# Altium PCB PCB1.PcbDoc (part 2 of 5)
Units mm, origin at the board's own origin, x right, y up, seen from the top; angles counter-clockwise.
Board outline 50 x 70 mm, 6 copper layers (Top Layer, L2, L3, L4, L5, Bottom Layer), stack 1.232 mm thick; 119 components, 75 nets, 612 pads, 243 vias.
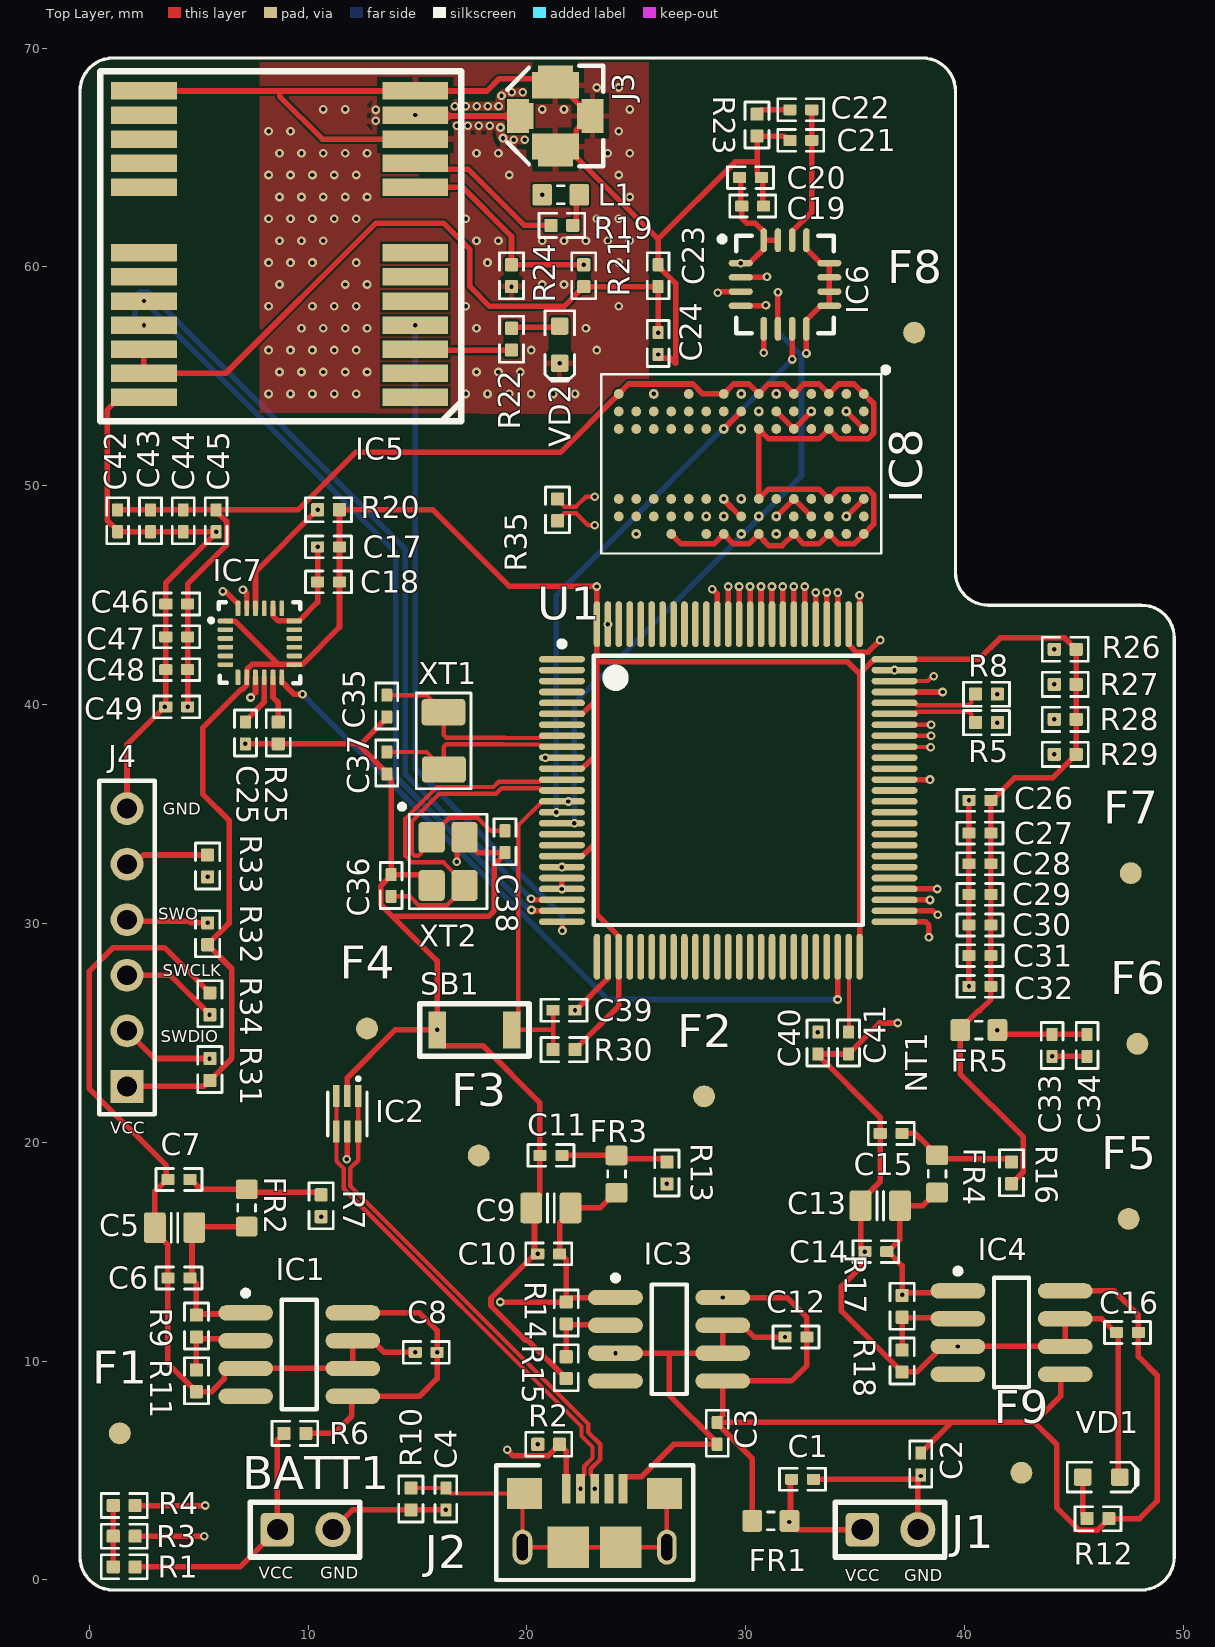
[diagram p0: Top Layer view]

## Part data (continued)
C22: library part Cap, "10V 470nF X5R ±10% 0402 Multilayer Ceramic Capacitors MLCC - SMD/SMT ROHS", Case Code (Imperial)=0402, Case Code (Metric)=1005, Dielectric=X5R, Dielectric Material=Ceramic, Manufacturer=Murata, Manufacturer Lifecycle Status=NRND, Manufacturer Package Identifier=GRM15-0.1, Manufacturer Part Number=GRM155R61A474KE15D, Max Operating Temperature=85°C, Min Operating Temperature=-55°C, Tolerance=10%, Voltage=10V, Case/Package=0402, Category="Ceramic Capacitors", ComponentLink1Description=https://datasheet.octopart.com:443/GRM155R61A474KE15D-Murata-datasheet-62317107.pdf?src-supplier=element14+APAC, ComponentLink1URL=https://datasheet.octopart.com:443/GRM155R61A474KE15D-Murata-datasheet-62317107.pdf?src-supplier=element14+APAC, ComponentLink2Description=https://datasheet.octopart.com:443/GRM155R61A474KE15D-Murata-datasheet-17853093.pdf?src-supplier=element14+APAC, ComponentLink2URL=https://datasheet.octopart.com:443/GRM155R61A474KE15D-Murata-datasheet-17853093.pdf?src-supplier=element14+APAC, ComponentLink3Description=https://datasheet.octopart.com:443/GRM155R61A474KE15D-Murata-datasheet-8817987.pdf?src-supplier=Newark, ComponentLink3URL=https://datasheet.octopart.com:443/GRM155R61A474KE15D-Murata-datasheet-8817987.pdf?src-supplier=Newark, ComponentLink4Description=https://datasheet.octopart.com:443/GRM155R61A474KE15D-Murata-datasheet-8332149.pdf?src-supplier=_legacy+Avnet, ComponentLink4URL=https://datasheet.octopart.com:443/GRM155R61A474KE15D-Murata-datasheet-8332149.pdf?src-supplier=_legacy+Avnet, ComponentLink5Description=https://datasheet.octopart.com:443/GRM155R61A474KE15D-Murata-datasheet-165579666.pdf?src-supplier=TME, ComponentLink5URL=https://datasheet.octopart.com:443/GRM155R61A474KE15D-Murata-datasheet-165579666.pdf?src-supplier=TME, ComponentLink6Description=https://datasheet.octopart.com:443/GRM155R61A474KE15D-Murata-datasheet-141266224.pdf?src-supplier=Ciiva, ComponentLink6URL=https://datasheet.octopart.com:443/GRM155R61A474KE15D-Murata-datasheet-141266224.pdf?src-supplier=Ciiva, ComponentLink7Description=https://datasheet.octopart.com:443/GRM155R61A474KE15D-Murata-datasheet-140690082.pdf?src-supplier=Ciiva, ComponentLink7URL=https://datasheet.octopart.com:443/GRM155R61A474KE15D-Murata-datasheet-140690082.pdf?src-supplier=Ciiva, ComponentLink8Description=https://datasheet.octopart.com:443/GRM155R61A474KE15D-Murata-datasheet-138740728.pdf?src-supplier=Ciiva, ComponentLink8URL=https://datasheet.octopart.com:443/GRM155R61A474KE15D-Murata-datasheet-138740728.pdf?src-supplier=Ciiva, ComponentLink9Description=https://datasheet.octopart.com:443/GRM155R61A474KE15D-Murata-datasheet-22122223.pdf?src-supplier=Future+Electronics, ComponentLink9URL=https://datasheet.octopart.com:443/GRM155R61A474KE15D-Murata-datasheet-22122223.pdf?src-supplier=Future+Electronics, ComponentLink10Description=https://datasheet.octopart.com:443/GRM155R61A474KE15D-Murata-datasheet-14396880.pdf?src-supplier=Future+Electronics, ComponentLink10URL=https://datasheet.octopart.com:443/GRM155R61A474KE15D-Murata-datasheet-14396880.pdf?src-supplier=Future+Electronics, ComponentLink11Description=https://datasheet.octopart.com:443/GRM155R61A474KE15D-Murata-datasheet-44106186.pdf?src-supplier=Future+Electronics, ComponentLink11URL=https://datasheet.octopart.com:443/GRM155R61A474KE15D-Murata-datasheet-44106186.pdf?src-supplier=Future+Electronics, ComponentLink12Description=https://datasheet.octopart.com/GRM155R61A474KE15D-Murata-datasheet-12515295.pdf, ComponentLink12URL=https://datasheet.octopart.com/GRM155R61A474KE15D-Murata-datasheet-12515295.pdf, ComponentLink13Description=https://datasheet.octopart.com/GRM155R61A474KE15D-Murata-datasheet-12510076.pdf, ComponentLink13URL=https://datasheet.octopart.com/GRM155R61A474KE15D-Murata-datasheet-12510076.pdf, ComponentLink14Description=https://datasheet.octopart.com/GRM155R61A474KE15D-Murata-datasheet-11978611.pdf, ComponentLink14URL=https://datasheet.octopart.com/GRM155R61A474KE15D-Murata-datasheet-11978611.pdf, ComponentLink15Description=https://datasheet.octopart.com/GRM155R61A474KE15D-Murata-datasheet-10025737.pdf, ComponentLink15URL=https://datasheet.octopart.com/GRM155R61A474KE15D-Murata-datasheet-10025737.pdf, ComponentLink16Description=https://datasheet.octopart.com/GRM155R61A474KE15D-Murata-datasheet-8819587.pdf, ComponentLink16URL=https://datasheet.octopart.com/GRM155R61A474KE15D-Murata-datasheet-8819587.pdf, ComponentLink17Description=https://datasheet.octopart.com/GRM155R61A474KE15D-Murata-datasheet-14396879.pdf, ComponentLink17URL=https://datasheet.octopart.com/GRM155R61A474KE15D-Murata-datasheet-14396879.pdf, ComponentLink18Description=https://datasheet.octopart.com:443/GRM155R61A474KE15D-Murata-datasheet-11969797.pdf?src-supplier=Arrow+Electronics, ComponentLink18URL=https://datasheet.octopart.com:443/GRM155R61A474KE15D-Murata-datasheet-11969797.pdf?src-supplier=Arrow+Electronics, ComponentLink19Description=https://datasheet.octopart.com:443/GRM155R61A474KE15D-Murata-datasheet-118811.pdf?src-supplier=DigiKey, ComponentLink19URL=https://datasheet.octopart.com:443/GRM155R61A474KE15D-Murata-datasheet-118811.pdf?src-supplier=DigiKey, ComponentLink20Description=http://sigma.octopart.com:80/reach_statement/Murata-company-16.pdf?src-supplier=Compliance+Statements, ComponentLink20URL=http://sigma.octopart.com:80/reach_statement/Murata-company-16.pdf?src-supplier=Compliance+Statements, Country of Origin=Philippines, Depth=500µm, Dissipation Factor=0.1%, Export Control Classification Number (ECCN) Code=EAR99, Harmonized Tariff Schedule (HTS) Code=8532.24.00.20, Height=500µm, Introduction Date=2006-06-22, Lead Free="Lead Free", Length=1mm, Lifecycle Status=NRND, Material=Ceramic, Mounting Technology="Surface Mount", Number of Terminals=2, Packaging="Cut Tape", Pins=2, Pricing="10000=0.0133, 20000=0.0132, 30000=0.013, 50000=0.0129, 70000=0.0127, 100000=0.0111 (USD)", Radiation Hardening=No, REACH SVHC=Yes, RoHS=Compliant, Schedule B="8532240020, 8532240020|8532240020, 8532240020|8532240020|8532240020, 8532240020|8532240020|8532240020|8532240020", Stock=1130000, Supplier="Arrow Electronics", Supplier Part Number=GRM155R61A474KE15D, Termination=SMD/SMT, Thickness=500µm, Voltage Rating=10V, Voltage Rating (DC)=10V, Width=500µm
C35 C37: library part Cap, "0402 4 pF 50 V ±0.25 pF Tolerance C0G SMT Multilayer Ceramic Capacitor", Case Code (Imperial)=0402, Case Code (Metric)=1005, Dielectric=C0G, Dielectric Material=Ceramic, Manufacturer=Murata, Manufacturer Lifecycle Status=NRND, Manufacturer Part Number=GRM1555C1H4R0CA01D, Max Operating Temperature=125°C, Min Operating Temperature=-55°C, Supplier Part Number=490-5873-1-ND, Voltage Rating=50V, Case/Package=0402, Category="Ceramic Capacitors", ComponentLink1Description=https://datasheet.octopart.com:443/GRM1555C1H4R0CA01D-Murata-datasheet-14396466.pdf?src-supplier=Future+Electronics, ComponentLink1URL=https://datasheet.octopart.com:443/GRM1555C1H4R0CA01D-Murata-datasheet-14396466.pdf?src-supplier=Future+Electronics, ComponentLink2Description=https://datasheet.octopart.com:443/GRM1555C1H4R0CA01D-Murata-datasheet-32479577.pdf?src-supplier=Future+Electronics, ComponentLink2URL=https://datasheet.octopart.com:443/GRM1555C1H4R0CA01D-Murata-datasheet-32479577.pdf?src-supplier=Future+Electronics, ComponentLink3Description=https://datasheet.octopart.com:443/GRM1555C1H4R0CA01D-Murata-datasheet-22122223.pdf?src-supplier=Future+Electronics, ComponentLink3URL=https://datasheet.octopart.com:443/GRM1555C1H4R0CA01D-Murata-datasheet-22122223.pdf?src-supplier=Future+Electronics, ComponentLink4Description=https://datasheet.octopart.com:443/GRM1555C1H4R0CA01D-Murata-datasheet-12519933.pdf?src-supplier=Future+Electronics, ComponentLink4URL=https://datasheet.octopart.com:443/GRM1555C1H4R0CA01D-Murata-datasheet-12519933.pdf?src-supplier=Future+Electronics, ComponentLink5Description=https://datasheet.octopart.com:443/GRM1555C1H4R0CA01D-Murata-datasheet-44105944.pdf?src-supplier=Future+Electronics, ComponentLink5URL=https://datasheet.octopart.com:443/GRM1555C1H4R0CA01D-Murata-datasheet-44105944.pdf?src-supplier=Future+Electronics, ComponentLink6Description=https://datasheet.octopart.com:443/GRM1555C1H4R0CA01D-Murata-datasheet-141274223.pdf?src-supplier=Ciiva, ComponentLink6URL=https://datasheet.octopart.com:443/GRM1555C1H4R0CA01D-Murata-datasheet-141274223.pdf?src-supplier=Ciiva, ComponentLink7Description=https://datasheet.octopart.com:443/GRM1555C1H4R0CA01D-Murata-datasheet-140682245.pdf?src-supplier=Ciiva, ComponentLink7URL=https://datasheet.octopart.com:443/GRM1555C1H4R0CA01D-Murata-datasheet-140682245.pdf?src-supplier=Ciiva, ComponentLink8Description=https://datasheet.octopart.com:443/GRM1555C1H4R0CA01D-Murata-datasheet-138739623.pdf?src-supplier=Ciiva, ComponentLink8URL=https://datasheet.octopart.com:443/GRM1555C1H4R0CA01D-Murata-datasheet-138739623.pdf?src-supplier=Ciiva, ComponentLink9Description=https://datasheet.octopart.com/GRM1555C1H4R0CA01D-Murata-datasheet-12515295.pdf, ComponentLink9URL=https://datasheet.octopart.com/GRM1555C1H4R0CA01D-Murata-datasheet-12515295.pdf, ComponentLink10Description=https://datasheet.octopart.com/GRM1555C1H4R0CA01D-Murata-datasheet-12510076.pdf, ComponentLink10URL=https://datasheet.octopart.com/GRM1555C1H4R0CA01D-Murata-datasheet-12510076.pdf, ComponentLink11Description=https://datasheet.octopart.com/GRM1555C1H4R0CA01D-Murata-datasheet-11978611.pdf, ComponentLink11URL=https://datasheet.octopart.com/GRM1555C1H4R0CA01D-Murata-datasheet-11978611.pdf, ComponentLink12Description=https://datasheet.octopart.com/GRM1555C1H4R0CA01D-Murata-datasheet-10025737.pdf, ComponentLink12URL=https://datasheet.octopart.com/GRM1555C1H4R0CA01D-Murata-datasheet-10025737.pdf, ComponentLink13Description=https://datasheet.octopart.com/GRM1555C1H4R0CA01D-Murata-datasheet-8819587.pdf, ComponentLink13URL=https://datasheet.octopart.com/GRM1555C1H4R0CA01D-Murata-datasheet-8819587.pdf, ComponentLink14Description=http://sigma.octopart.com:80/reach_statement/Murata-company-16.pdf?src-supplier=Compliance+Statements, ComponentLink14URL=http://sigma.octopart.com:80/reach_statement/Murata-company-16.pdf?src-supplier=Compliance+Statements, Depth=500µm, Height=500µm, Lead Free="Lead Free", Length=1mm, Lifecycle Status=NRND, Mounting Technology="Surface Mount", Number of Terminals=2, Pricing="1=0.1, 10=0.033, 50=0.0222, 100=0.0189, 500=0.01344, 1000=0.01178, 2500=0.01003, 5000=0.00898 (USD)", Radiation Hardening=No, REACH SVHC=Yes, RoHS=Compliant, Schedule B="8532240020, 8532240020|8532240020, 8532240020|8532240020|8532240020, 8532240020|8532240020|8532240020|8532240020", Stock=3655, Supplier=DigiKey, Termination=SMD/SMT, Thickness=500µm, Voltage Rating (DC)=50V, Width=500µm
C36 C38: library part Cap, "0402 50 V 33 pF ±5% C0G Surface Mount Mulilayer Ceramic Chip Capacitor", Case Code (Imperial)=0402, Case Code (Metric)=1005, Dielectric=C0G, Dielectric Material=Ceramic, Manufacturer=Murata, Manufacturer Lifecycle Status=NRND, Manufacturer Part Number=GRM1555C1H330JA01D, Max Operating Temperature=125°C, Min Operating Temperature=-55°C, Tolerance=5%, Voltage=50V, Case/Package=0402, Category="Ceramic Capacitors", ComponentLink1Description=https://datasheet.octopart.com:443/GRM1555C1H330JA01D-Murata-datasheet-11770415.pdf?src-supplier=_legacy+Avnet, ComponentLink1URL=https://datasheet.octopart.com:443/GRM1555C1H330JA01D-Murata-datasheet-11770415.pdf?src-supplier=_legacy+Avnet, ComponentLink2Description=https://datasheet.octopart.com:443/GRM1555C1H330JA01D-Murata-datasheet-62317068.pdf?src-supplier=element14+APAC, ComponentLink2URL=https://datasheet.octopart.com:443/GRM1555C1H330JA01D-Murata-datasheet-62317068.pdf?src-supplier=element14+APAC, ComponentLink3Description=https://datasheet.octopart.com/GRM1555C1H330JA01D-Murata-datasheet-12534113.pdf, ComponentLink3URL=https://datasheet.octopart.com/GRM1555C1H330JA01D-Murata-datasheet-12534113.pdf, ComponentLink4Description=https://datasheet.octopart.com/GRM1555C1H330JA01D-Murata-datasheet-12515295.pdf, ComponentLink4URL=https://datasheet.octopart.com/GRM1555C1H330JA01D-Murata-datasheet-12515295.pdf, ComponentLink5Description=https://datasheet.octopart.com/GRM1555C1H330JA01D-Murata-datasheet-12510076.pdf, ComponentLink5URL=https://datasheet.octopart.com/GRM1555C1H330JA01D-Murata-datasheet-12510076.pdf, ComponentLink6Description=https://datasheet.octopart.com/GRM1555C1H330JA01D-Murata-datasheet-11978611.pdf, ComponentLink6URL=https://datasheet.octopart.com/GRM1555C1H330JA01D-Murata-datasheet-11978611.pdf, ComponentLink7Description=https://datasheet.octopart.com/GRM1555C1H330JA01D-Murata-datasheet-10025737.pdf, ComponentLink7URL=https://datasheet.octopart.com/GRM1555C1H330JA01D-Murata-datasheet-10025737.pdf, ComponentLink8Description=https://datasheet.octopart.com/GRM1555C1H330JA01D-Murata-datasheet-8819587.pdf, ComponentLink8URL=https://datasheet.octopart.com/GRM1555C1H330JA01D-Murata-datasheet-8819587.pdf, ComponentLink9Description=https://datasheet.octopart.com:443/GRM1555C1H330JA01D-Murata-datasheet-165579666.pdf?src-supplier=TME, ComponentLink9URL=https://datasheet.octopart.com:443/GRM1555C1H330JA01D-Murata-datasheet-165579666.pdf?src-supplier=TME, ComponentLink10Description=https://datasheet.octopart.com:443/GRM1555C1H330JA01D-Murata-datasheet-59876780.pdf?src-supplier=TME, ComponentLink10URL=https://datasheet.octopart.com:443/GRM1555C1H330JA01D-Murata-datasheet-59876780.pdf?src-supplier=TME, ComponentLink11Description=https://datasheet.octopart.com:443/GRM1555C1H330JA01D-Murata-datasheet-141266224.pdf?src-supplier=Ciiva, ComponentLink11URL=https://datasheet.octopart.com:443/GRM1555C1H330JA01D-Murata-datasheet-141266224.pdf?src-supplier=Ciiva, ComponentLink12Description=https://datasheet.octopart.com:443/GRM1555C1H330JA01D-Murata-datasheet-140681757.pdf?src-supplier=Ciiva, ComponentLink12URL=https://datasheet.octopart.com:443/GRM1555C1H330JA01D-Murata-datasheet-140681757.pdf?src-supplier=Ciiva, ComponentLink13Description=https://datasheet.octopart.com:443/GRM1555C1H330JA01D-Murata-datasheet-138739568.pdf?src-supplier=Ciiva, ComponentLink13URL=https://datasheet.octopart.com:443/GRM1555C1H330JA01D-Murata-datasheet-138739568.pdf?src-supplier=Ciiva, ComponentLink14Description=https://datasheet.octopart.com:443/GRM1555C1H330JA01D-Murata-datasheet-32479577.pdf?src-supplier=Future+Electronics, ComponentLink14URL=https://datasheet.octopart.com:443/GRM1555C1H330JA01D-Murata-datasheet-32479577.pdf?src-supplier=Future+Electronics, ComponentLink15Description=https://datasheet.octopart.com:443/GRM1555C1H330JA01D-Murata-datasheet-22122223.pdf?src-supplier=Future+Electronics, ComponentLink15URL=https://datasheet.octopart.com:443/GRM1555C1H330JA01D-Murata-datasheet-22122223.pdf?src-supplier=Future+Electronics, ComponentLink16Description=https://datasheet.octopart.com:443/GRM1555C1H330JA01D-Murata-datasheet-44105931.pdf?src-supplier=Future+Electronics, ComponentLink16URL=https://datasheet.octopart.com:443/GRM1555C1H330JA01D-Murata-datasheet-44105931.pdf?src-supplier=Future+Electronics, ComponentLink17Description=http://sigma.octopart.com:80/reach_statement/Murata-company-16.pdf?src-supplier=Compliance+Statements, ComponentLink17URL=http://sigma.octopart.com:80/reach_statement/Murata-company-16.pdf?src-supplier=Compliance+Statements, Depth=500µm, Export Control Classification Number (ECCN) Code=EAR99, Harmonized Tariff Schedule (HTS) Code=8532.24.00.20, Height=500µm, Introduction Date=2003-10-14, Lead Free="Lead Free", Length=1mm, Lifecycle Status=NRND, Material=Ceramic, Mounting Technology="Surface Mount", Number of Terminals=2, Packaging="Cut Tape", Pricing="30000=0.0036, 50000=0.003, 100000=0.0029 (USD)", Radiation Hardening=No, REACH SVHC=Yes, RoHS=Compliant, Schedule B="8532240020, 8532240020|8532240020, 8532240020|8532240020|8532240020, 8532240020|8532240020|8532240020|8532240020", Stock=4080000, Supplier="Arrow Electronics", Supplier Part Number=GRM1555C1H330JA01D, Termination=SMD/SMT, Thickness=500µm, Voltage Rating=50V, Voltage Rating (DC)=50V, Width=500µm
C40 C41 C48: library part Cap, "0402 2.2 uF 4 V ±20% Tolerance X5R SMT Multilayer Ceramic Capacitor", Case Code (Imperial)=0402, Case Code (Metric)=1005, Dielectric=X5R, Dielectric Material=Ceramic, Manufacturer=Murata, Manufacturer Lifecycle Status="IN PRODUCTION", Manufacturer Part Number=GRM155R60G225ME15D, Max Operating Temperature=85°C, Min Operating Temperature=-55°C, Tolerance=20%, Voltage=4V, Case/Package=0402, Category="Ceramic Capacitors", ComponentLink1Description=https://datasheet.octopart.com:443/GRM155R60G225ME15D-Murata-datasheet-531337.pdf?src-supplier=_legacy+Avnet, ComponentLink1URL=https://datasheet.octopart.com:443/GRM155R60G225ME15D-Murata-datasheet-531337.pdf?src-supplier=_legacy+Avnet, ComponentLink2Description=https://datasheet.octopart.com:443/GRM155R60G225ME15D-Murata-datasheet-22975617.pdf?src-supplier=Newark, ComponentLink2URL=https://datasheet.octopart.com:443/GRM155R60G225ME15D-Murata-datasheet-22975617.pdf?src-supplier=Newark, ComponentLink3Description=https://datasheet.octopart.com:443/GRM155R60G225ME15D-Murata-datasheet-62317092.pdf?src-supplier=element14+APAC, ComponentLink3URL=https://datasheet.octopart.com:443/GRM155R60G225ME15D-Murata-datasheet-62317092.pdf?src-supplier=element14+APAC, ComponentLink4Description=https://datasheet.octopart.com:443/GRM155R60G225ME15D-Murata-datasheet-179072682.pdf?src-supplier=Arrow.cn, ComponentLink4URL=https://datasheet.octopart.com:443/GRM155R60G225ME15D-Murata-datasheet-179072682.pdf?src-supplier=Arrow.cn, ComponentLink5Description=https://datasheet.octopart.com:443/GRM155R60G225ME15D-Murata-datasheet-150009138.pdf?src-supplier=Arrow.cn, ComponentLink5URL=https://datasheet.octopart.com:443/GRM155R60G225ME15D-Murata-datasheet-150009138.pdf?src-supplier=Arrow.cn, ComponentLink6Description=https://datasheet.octopart.com:443/GRM155R60G225ME15D-Murata-datasheet-165579666.pdf?src-supplier=TME, ComponentLink6URL=https://datasheet.octopart.com:443/GRM155R60G225ME15D-Murata-datasheet-165579666.pdf?src-supplier=TME, ComponentLink7Description=https://datasheet.octopart.com:443/GRM155R60G225ME15D-Murata-datasheet-141266224.pdf?src-supplier=Ciiva, ComponentLink7URL=https://datasheet.octopart.com:443/GRM155R60G225ME15D-Murata-datasheet-141266224.pdf?src-supplier=Ciiva, ComponentLink8Description=https://datasheet.octopart.com:443/GRM155R60G225ME15D-Murata-datasheet-140689263.pdf?src-supplier=Ciiva, ComponentLink8URL=https://datasheet.octopart.com:443/GRM155R60G225ME15D-Murata-datasheet-140689263.pdf?src-supplier=Ciiva, ComponentLink9Description=https://datasheet.octopart.com:443/GRM155R60G225ME15D-Murata-datasheet-138740623.pdf?src-supplier=Ciiva, ComponentLink9URL=https://datasheet.octopart.com:443/GRM155R60G225ME15D-Murata-datasheet-138740623.pdf?src-supplier=Ciiva, ComponentLink10Description=https://datasheet.octopart.com:443/GRM155R60G225ME15D-Murata-datasheet-96971104.pdf?src-supplier=Future+Electronics, ComponentLink10URL=https://datasheet.octopart.com:443/GRM155R60G225ME15D-Murata-datasheet-96971104.pdf?src-supplier=Future+Electronics, ComponentLink11Description=https://datasheet.octopart.com:443/GRM155R60G225ME15D-Murata-datasheet-22122223.pdf?src-supplier=Future+Electronics, ComponentLink11URL=https://datasheet.octopart.com:443/GRM155R60G225ME15D-Murata-datasheet-22122223.pdf?src-supplier=Future+Electronics, ComponentLink12Description=https://datasheet.octopart.com:443/GRM155R60G225ME15D-Murata-datasheet-14400451.pdf?src-supplier=Future+Electronics, ComponentLink12URL=https://datasheet.octopart.com:443/GRM155R60G225ME15D-Murata-datasheet-14400451.pdf?src-supplier=Future+Electronics, ComponentLink13Description=https://datasheet.octopart.com:443/GRM155R60G225ME15D-Murata-datasheet-44106066.pdf?src-supplier=Future+Electronics, ComponentLink13URL=https://datasheet.octopart.com:443/GRM155R60G225ME15D-Murata-datasheet-44106066.pdf?src-supplier=Future+Electronics, ComponentLink14Description=https://datasheet.octopart.com/GRM155R60G225ME15D-Murata-datasheet-12515295.pdf, ComponentLink14URL=https://datasheet.octopart.com/GRM155R60G225ME15D-Murata-datasheet-12515295.pdf, ComponentLink15Description=https://datasheet.octopart.com/GRM155R60G225ME15D-Murata-datasheet-12510076.pdf, ComponentLink15URL=https://datasheet.octopart.com/GRM155R60G225ME15D-Murata-datasheet-12510076.pdf, ComponentLink16Description=https://datasheet.octopart.com/GRM155R60G225ME15D-Murata-datasheet-11978611.pdf, ComponentLink16URL=https://datasheet.octopart.com/GRM155R60G225ME15D-Murata-datasheet-11978611.pdf, ComponentLink17Description=https://datasheet.octopart.com/GRM155R60G225ME15D-Murata-datasheet-10025737.pdf, ComponentLink17URL=https://datasheet.octopart.com/GRM155R60G225ME15D-Murata-datasheet-10025737.pdf, ComponentLink18Description=https://datasheet.octopart.com/GRM155R60G225ME15D-Murata-datasheet-8819587.pdf, ComponentLink18URL=https://datasheet.octopart.com/GRM155R60G225ME15D-Murata-datasheet-8819587.pdf, ComponentLink19Description=https://datasheet.octopart.com/GRM155R60G225ME15D-Murata-datasheet-17504155.pdf, ComponentLink19URL=https://datasheet.octopart.com/GRM155R60G225ME15D-Murata-datasheet-17504155.pdf, ComponentLink20Description=https://datasheet.octopart.com:443/GRM155R60G225ME15D-Murata-datasheet-118811.pdf?src-supplier=DigiKey, ComponentLink20URL=https://datasheet.octopart.com:443/GRM155R60G225ME15D-Murata-datasheet-118811.pdf?src-supplier=DigiKey, ComponentLink21Description=http://sigma.octopart.com:80/reach_statement/Murata-company-16.pdf?src-supplier=Compliance+Statements, ComponentLink21URL=http://sigma.octopart.com:80/reach_statement/Murata-company-16.pdf?src-supplier=Compliance+Statements, Depth=500µm, Height=500µm, Lead Free="Lead Free", Length=1mm, Lifecycle Status=Production, Material=Ceramic, Mounting Technology="Surface Mount", Number of Terminals=2, Packaging="Cut Tape", Pricing="10000=0.0258 (EUR)", Radiation Hardening=No, REACH SVHC=Yes, RoHS=Compliant, Schedule B="8532240020, 8532240020|8532240020|8532240020|8532240020|8532240020", Stock=10000, Supplier=Farnell, Supplier Part Number=GRM155R60G225ME15D, Termination=SMD/SMT, Thickness=500µm, Voltage Rating=4V, Voltage Rating (DC)=4V, Width=500µm
FR1 FR2 FR3 FR4 FR5: library part Ferrite, "Ferrite Beads Multi-Layer 600Ohm 25% 100MHz 500mA 380mOhm DCR 0603 Automotive Paper T/R", Case Code (Imperial)=0603, Case Code (Metric)=1608, Clock Frequency=100MHz, Current Rating=500mA, DC Resistance (DCR)=380mΩ, Manufacturer=Murata, Manufacturer Part Number=BLM18AG601SN1D, Max Operating Temperature=125°C, Min Operating Temperature=-55°C, Tolerance=25%, Case/Package=0603, Category="Ferrite Beads and Chips", ComponentLink1Description=https://datasheet.octopart.com:443/BLM18AG601SN1D-Murata-datasheet-180806579.pdf?src-supplier=IHS, ComponentLink1URL=https://datasheet.octopart.com:443/BLM18AG601SN1D-Murata-datasheet-180806579.pdf?src-supplier=IHS, ComponentLink2Description=https://datasheet.octopart.com:443/BLM18AG601SN1D-Murata-datasheet-41195.pdf?src-supplier=Upverter, ComponentLink2URL=https://datasheet.octopart.com:443/BLM18AG601SN1D-Murata-datasheet-41195.pdf?src-supplier=Upverter, ComponentLink3Description=https://datasheet.octopart.com:443/BLM18AG601SN1D-Murata-datasheet-11743096.pdf?src-supplier=Newark, ComponentLink3URL=https://datasheet.octopart.com:443/BLM18AG601SN1D-Murata-datasheet-11743096.pdf?src-supplier=Newark, ComponentLink4Description=https://datasheet.octopart.com:443/BLM18AG601SN1D-Murata-datasheet-5338592.pdf?src-supplier=Newark, ComponentLink4URL=https://datasheet.octopart.com:443/BLM18AG601SN1D-Murata-datasheet-5338592.pdf?src-supplier=Newark, ComponentLink5Description=https://datasheet.octopart.com:443/BLM18AG601SN1D-Murata-datasheet-511221.pdf?src-supplier=TME, ComponentLink5URL=https://datasheet.octopart.com:443/BLM18AG601SN1D-Murata-datasheet-511221.pdf?src-supplier=TME, ComponentLink6Description=https://datasheet.octopart.com:443/BLM18AG601SN1D-Murata-datasheet-135086656.pdf?src-supplier=TME, ComponentLink6URL=https://datasheet.octopart.com:443/BLM18AG601SN1D-Murata-datasheet-135086656.pdf?src-supplier=TME, ComponentLink7Description=https://datasheet.octopart.com:443/BLM18AG601SN1D-Murata-datasheet-5396529.pdf?src-supplier=Factory+Futures, ComponentLink7URL=https://datasheet.octopart.com:443/BLM18AG601SN1D-Murata-datasheet-5396529.pdf?src-supplier=Factory+Futures, ComponentLink8Description=https://datasheet.octopart.com:443/BLM18AG601SN1D-Murata-datasheet-141257898.pdf?src-supplier=Ciiva, ComponentLink8URL=https://datasheet.octopart.com:443/BLM18AG601SN1D-Murata-datasheet-141257898.pdf?src-supplier=Ciiva, ComponentLink9Description=https://datasheet.octopart.com:443/BLM18AG601SN1D-Murata-datasheet-138706784.pdf?src-supplier=Ciiva, ComponentLink9URL=https://datasheet.octopart.com:443/BLM18AG601SN1D-Murata-datasheet-138706784.pdf?src-supplier=Ciiva, ComponentLink10Description=https://datasheet.octopart.com:443/BLM18AG601SN1D-Murata-datasheet-78375072.pdf?src-supplier=Future+Electronics, ComponentLink10URL=https://datasheet.octopart.com:443/BLM18AG601SN1D-Murata-datasheet-78375072.pdf?src-supplier=Future+Electronics, ComponentLink11Description=https://datasheet.octopart.com:443/BLM18AG601SN1D-Murata-datasheet-58177255.pdf?src-supplier=Future+Electronics, ComponentLink11URL=https://datasheet.octopart.com:443/BLM18AG601SN1D-Murata-datasheet-58177255.pdf?src-supplier=Future+Electronics, ComponentLink12Description=https://datasheet.octopart.com/BLM18AG601SN1D-Murata-datasheet-37129980.pdf, ComponentLink12URL=https://datasheet.octopart.com/BLM18AG601SN1D-Murata-datasheet-37129980.pdf, ComponentLink13Description=https://datasheet.octopart.com:443/BLM18AG601SN1D-Murata-datasheet-14066397.pdf?src-supplier=iiiC, ComponentLink13URL=https://datasheet.octopart.com:443/BLM18AG601SN1D-Murata-datasheet-14066397.pdf?src-supplier=iiiC, ComponentLink14Description=https://datasheet.octopart.com:443/BLM18AG601SN1D-Murata-datasheet-9604654.pdf?src-supplier=RS+(Formerly+Allied+Electronics), ComponentLink14URL=https://datasheet.octopart.com:443/BLM18AG601SN1D-Murata-datasheet-9604654.pdf?src-supplier=RS+(Formerly+Allied+Electronics), ComponentLink15Description=https://datasheet.octopart.com:443/BLM18AG601SN1D-Murata-datasheet-13143.pdf?src-supplier=RS+(Formerly+Allied+Electronics), ComponentLink15URL=https://datasheet.octopart.com:443/BLM18AG601SN1D-Murata-datasheet-13143.pdf?src-supplier=RS+(Formerly+Allied+Electronics), ComponentLink16Description=https://datasheet.octopart.com:443/BLM18AG601SN1D-Murata-datasheet-7628479.pdf?src-supplier=Jameco, ComponentLink16URL=https://datasheet.octopart.com:443/BLM18AG601SN1D-Murata-datasheet-7628479.pdf?src-supplier=Jameco, ComponentLink17Description=https://datasheet.octopart.com:443/BLM18AG601SN1D-Murata-datasheet-11030792.pdf?src-supplier=Farnell, ComponentLink17URL=https://datasheet.octopart.com:443/BLM18AG601SN1D-Murata-datasheet-11030792.pdf?src-supplier=Farnell, ComponentLink18Description=http://sigma.octopart.com:80/reach_statement/Murata-company-16.pdf?src-supplier=Compliance+Statements, ComponentLink18URL=http://sigma.octopart.com:80/reach_statement/Murata-company-16.pdf?src-supplier=Compliance+Statements, Core Material=Ferrite, Country of Origin="Japan, Thailand", DC Current=500mA, Depth=800µm, ESR=380mΩ, Export Control Classification Number (ECCN) Code=EAR99, Frequency=100MHz, Harmonized Tariff Schedule (HTS) Code=8504.50.80.00, Height=800µm, Impedance=600Ω, Introduction Date=2001-08-28, Lead Free="Lead Free", Length=1.6mm, Lifecycle Status=Production, Material="Ferrite, Steel", Max Current Rating=500mA, Max DC Current=500mA, Military Standard=Not, Mounting Technology="Surface Mount", Number of Circuits=1, Number of Lines=1, Number of Terminals=2, Packaging="Cut Tape", Pins=2, Pricing="10=0.0535, 100=0.0382, 500=0.0296, 1000=0.0258, 2000=0.023, 4000=0.0201 (EUR)", Radiation Hardening=No, REACH SVHC=Yes, RMS Current (Irms)=500mA, RoHS=Compliant, Schedule B="8543706000, 8543706000|8543706000, 8543706000|8543706000|8543706000, 8543706000|8543706000|8543706000|8543706000", Shielding=Unshielded, Stock=228982, Supplier=Farnell, Supplier Part Number=BLM18AG601SN1D, Termination=SMD/SMT, Test Frequency=100MHz, Weight=2.012816mg, Width=800µm
IC1 IC3 IC4: library part LT1763MPS8, "500 mA, Low Noise, LDO Micropower Regulator, 1.8 to 20 V Vin, Adjustable Vout, 8-pin SOIC (S8-8), -55 to 125 degC", Dropout Voltage(V)=0.3, Manufacturer="Linear Technology", Output Voltage=Adj, Shutdown Current(uA)=1, Supplier Part Number 1=57M6069, ComponentLink1Description="Manufacturer URL", ComponentLink1URL=http://www.linear.com/, ComponentLink2Description=Datasheet, ComponentLink2URL=http://cds.linear.com/docs/en/datasheet/1763fg.pdf, ComponentLink3Description="Package Specification", ComponentLink3URL=http://cds.linear.com/docs/en/packaging/05081610_G_SO8.pdf, DatasheetVersion="Rev. G", Discrete Pass Element=no, Iout(mA)=500, Isupply(mA)=0.03, Mounting Technology="Surface Mount", Noise(uV)=20, Number of Outputs=1, PackageDescription="8-Pin Plastic Small Outline (Narrow .150 Inch), Body 4.9 x 3.9 mm, Pitch 1.27 mm", PackageReference=S8-8, PackageVersion="Rev. G, 03/2012", PartNumber=LT1763MPS8, PSRR(dB)=65, RoHS=FALSE, Supplier 1=Newark, Vin Max(V)=20, Vin Min(V)=1.8, Vout Max(V)=20, Vout Min(V)=1.22
IC2: library part USBULC6-2P6, Capacitance @ Frequency="1pF @ 1MHz", Current - Peak Pulse (10/1000µs)="5A (8/20µs)", Manufacturer=STMicroelectronics, Operating Temperature=-, Package / Case="SOT-563, SOT-666", Power Line Protection=Yes, Supplier Device Package=SOT-666, Supplier Part Number 1=497-15162-1-ND, Voltage - Breakdown (Min)=6V, Voltage - Clamping (Max) @ Ipp=17V, Voltage - Reverse Standoff (Typ)=5V, Applications=Ethernet, Bidirectional Channels=2, Category="Circuit Protection", Manufacturer Part Number 1=USBULC6-2P6, Mounting Type="Surface Mount", Packaging="Cut Tape (CT)", Power - Peak Pulse=-, RoHS="RoHS Compliant", Supplier 1=Digi-Key, Type="Steering (Rail to Rail)", Unidirectional Channels=-
IC5: "NEO-M8 Series 1.575GHz -167dBm BeiDou Galileo GLONASS GNSS GPS Concurrent Module", Manufacturer=U-blox, Manufacturer Part Number=NEO-M8M-0, Max Operating Temperature=85°C, Min Operating Temperature=-40°C, Operating Supply Voltage=3V, Ratings=AEC-Q100, Supplier Part Number=377-NEO-M8M-0, Temperature Grade=Industrial, Category="RF Receivers, Transceivers", ComponentLink1Description=https://www.u-blox.com/en/product/neo-7-series, ComponentLink1URL=https://www.u-blox.com/en/product/neo-7-series, ComponentLink2Description=Datasheet, ComponentLink3Description=https://datasheet.octopart.com:443/NEO-M8M-0-u-blox-datasheet-181463448.pdf?src-supplier=IHS, ComponentLink3URL=https://datasheet.octopart.com:443/NEO-M8M-0-u-blox-datasheet-181463448.pdf?src-supplier=IHS, ComponentLink4Description=https://datasheet.octopart.com:443/NEO-M8M-0-u-blox-datasheet-166811445.pdf?src-supplier=TME, ComponentLink4URL=https://datasheet.octopart.com:443/NEO-M8M-0-u-blox-datasheet-166811445.pdf?src-supplier=TME, ComponentLink5Description=https://datasheet.octopart.com:443/NEO-M8M-0-u-blox-datasheet-166811443.pdf?src-supplier=TME, ComponentLink5URL=https://datasheet.octopart.com:443/NEO-M8M-0-u-blox-datasheet-166811443.pdf?src-supplier=TME, ComponentLink6Description=https://datasheet.octopart.com:443/NEO-M8M-0-u-blox-datasheet-100446454.pdf?src-supplier=TME, ComponentLink6URL=https://datasheet.octopart.com:443/NEO-M8M-0-u-blox-datasheet-100446454.pdf?src-supplier=TME, ComponentLink7Description=https://datasheet.octopart.com:443/NEO-M8M-0-u-blox-datasheet-163637401.pdf?src-supplier=Future+Electronics, ComponentLink7URL=https://datasheet.octopart.com:443/NEO-M8M-0-u-blox-datasheet-163637401.pdf?src-supplier=Future+Electronics, DatasheetVersion="R07 11-Nov-2014", Height - Seated (Max)=2.6mm, Introduction Date=2016-04-08, Length=16mm, Lifecycle Status=Production, Number of Circuits=1, Number of Terminals=24, PackageDescription="NEO-7 series 12.2 x 16 x 2.4 mm", Pricing="1=21.26, 10=20.18, 50=16.56, 100=13.27, 1000=13.27, 10000=13.27 (USD)", REACH SVHC=Yes, RoHS=Compliant, Stock=605, Supplier=Mouser, Terminal Pitch=1.1mm, Width=12.2mm
IC6: "MEMS motion sensor: three-axis digital output gyroscope", Case/Package=TFLGA, Manufacturer=STMicroelectronics, Max Operating Temperature=85°C, Max Supply Voltage=3.6V, Min Operating Temperature=-40°C, Min Supply Voltage=2.4V, Operating Supply Current=6.1mA, Operating Supply Voltage=3V, Temperature Grade=Industrial, Category=Gyroscopes, China RoHS=Non-Compliant, ComponentLink1Description=http://www.st.com/web/en/resource/technical/document/datasheet/CD00265057.pdf, ComponentLink1URL=http://www.st.com/web/en/resource/technical/document/datasheet/CD00265057.pdf, ComponentLink2Description=Datasheet, ComponentLink3Description=https://datasheet.octopart.com:443/L3G4200D-STMicroelectronics-datasheet-10837909.pdf?src-supplier=IHS, ComponentLink3URL=https://datasheet.octopart.com:443/L3G4200D-STMicroelectronics-datasheet-10837909.pdf?src-supplier=IHS, ComponentLink4Description=https://datasheet.octopart.com:443/L3G4200D-STMicroelectronics-datasheet-23704525.pdf?src-supplier=STMicroelectronics, ComponentLink4URL=https://datasheet.octopart.com:443/L3G4200D-STMicroelectronics-datasheet-23704525.pdf?src-supplier=STMicroelectronics, ComponentLink5Description=https://datasheet.octopart.com:443/L3G4200D-STMicroelectronics-datasheet-15943594.pdf?src-supplier=iiiC, ComponentLink5URL=https://datasheet.octopart.com:443/L3G4200D-STMicroelectronics-datasheet-15943594.pdf?src-supplier=iiiC, ComponentLink6Description=https://datasheet.octopart.com:443/L3G4200D-STMicroelectronics-datasheet-10030983.pdf?src-supplier=Farnell, ComponentLink6URL=https://datasheet.octopart.com:443/L3G4200D-STMicroelectronics-datasheet-10030983.pdf?src-supplier=Farnell, ComponentLink7Description=https://datasheet.octopart.com:443/L3G4200D-STMicroelectronics-datasheet-10413738.pdf?src-supplier=Farnell, ComponentLink7URL=https://datasheet.octopart.com:443/L3G4200D-STMicroelectronics-datasheet-10413738.pdf?src-supplier=Farnell, DatasheetVersion="Doc ID 17116 Rev 3", Depth=4mm, Harmonized Tariff Schedule (HTS) Code=8542.39.00.01, Height=1mm, Height - Seated (Max)=1.1mm, Interface="I2C, SPI, Serial", Introduction Date=2010-02-12, Lead Free="Lead Free", Length=4mm, Lifecycle Status=Obsolete, LTB Date=2015-07-23, LTD Date=2016-01-23, Manufacturer Part Number=L3G4200D, Max Supply Voltage (DC)=3.6V, Min Supply Voltage (DC)=2.4V, Mounting Technology="Surface Mount", Number of Circuits=1, Number of Terminals=16, Output Type="Digital, I2C, SPI", PackageDescription="LGA-16 (4x4x1.1 mm)", Pins=16, Pricing="1=6.28, 10=6.06, 100=5.83, 300=5.61, 800=5.38, 2000=5.16, 3000=4.93 (EUR)", Radiation Hardening=No, REACH SVHC=Yes, Resolution=2B, RoHS=Compliant, Sensor Type="3 Axis", Supplier=Farnell, Supplier Part Number=L3G4200D, Terminal Pitch=650µm, Width=4mm
IC7: "The MPU-9255 is a 3-axis gyroscope, 3-axis accelerometer, and 3-axis digital compass designed specifically for Automatic Activity Recognition library (AAR™) in a 3 x 3 mm package", Manufacturer=InvenSense, ComponentLink1Description=http://www.invensense.com/products/motion-tracking/9-axis/mpu-9255-2/, ComponentLink1URL=http://www.invensense.com/, ComponentLink2Description=Datasheet, ComponentLink2URL=http://43zrtwysvxb2gf29r5o0athu.wpengine.netdna-cdn.com/wp-content/uploads/2015/01/PS-MPU-92551.pdf, DatasheetVersion="Release Date: 09/14/2014", PackageDescription="24-Pin 3X3X1 QFN"
IC8: Manufacturer="Alliance Memory, Inc.", Operating Temperature="0°C ~ 70°C", Package / Case=84-TFBGA, Supplier Device Package="84-FBGA (8x12.5)", Supplier Part Number 1=1450-1158-ND, Voltage - Supply="1.7 V ~ 1.9 V", Category="Integrated Circuits (ICs)", Format - Memory=RAM, Interface=Parallel, Manufacturer Part Number 1=AS4C64M16D2-25BCN, Memory Size="1G (64M x 16)", Memory Type="DDR2 SDRAM", Packaging=Tray, RoHS="RoHS Compliant", Speed=400MHz, Supplier 1=Digi-Key
J1: library part Header2P, "2pin 2.54mm 1 Breakaway, Header, Push-Pull 4A 380nm 5.08mm*2.4892mm", Case/Package=100, Color=Black, Contact Resistance=20mΩ, Current Rating=4A, Insulation Resistance=50GΩ, Manufacturer=3M, Manufacturer Lifecycle Status=ACTIVE, Manufacturer Part Number=22-28-5023, Manufacturer Part Number 1=961102-6404-AR, Max Operating Temperature=75°C, Min Operating Temperature=-40°C, Ratings=CSA, Supplier Part Number 1=3M9447-ND, Voltage Rating=250V, Category="Connectors, Interconnects", China RoHS=Compliant, ComponentLink1Description=https://datasheet.octopart.com:443/22-28-5023-Molex-datasheet-166051265.pdf?src-supplier=Farnell, ComponentLink1URL=https://datasheet.octopart.com:443/22-28-5023-Molex-datasheet-166051265.pdf?src-supplier=Farnell, ComponentLink2Description=https://datasheet.octopart.com:443/22-28-5023-Molex-datasheet-13787698.pdf?src-supplier=Molex, ComponentLink2URL=https://datasheet.octopart.com:443/22-28-5023-Molex-datasheet-13787698.pdf?src-supplier=Molex, ComponentLink3Description=https://sigma.octopart.com:443/16300370/technical_drawing/Molex-22-28-5023.pdf?src-supplier=Molex, ComponentLink3URL=https://sigma.octopart.com:443/16300370/technical_drawing/Molex-22-28-5023.pdf?src-supplier=Molex, ComponentLink4Description=https://datasheet.octopart.com:443/022285023-Molex-datasheet-8333692.pdf?src-supplier=HQonline, ComponentLink4URL=https://datasheet.octopart.com:443/022285023-Molex-datasheet-8333692.pdf?src-supplier=HQonline, ComponentLink5Description=https://datasheet.octopart.com:443/22-28-5023-Molex-datasheet-154747312.pdf?src-supplier=Master+Electronics, ComponentLink5URL=https://datasheet.octopart.com:443/22-28-5023-Molex-datasheet-154747312.pdf?src-supplier=Master+Electronics, ComponentLink6Description=https://datasheet.octopart.com:443/22-28-5023-Molex-datasheet-140181294.pdf?src-supplier=RS+(Formerly+Allied+Electronics), ComponentLink6URL=https://datasheet.octopart.com:443/22-28-5023-Molex-datasheet-140181294.pdf?src-supplier=RS+(Formerly+Allied+Electronics), ComponentLink7Description=https://datasheet.octopart.com:443/22-28-5023-Molex-datasheet-120146353.pdf?src-supplier=RS+(Formerly+Allied+Electronics), ComponentLink7URL=https://datasheet.octopart.com:443/22-28-5023-Molex-datasheet-120146353.pdf?src-supplier=RS+(Formerly+Allied+Electronics), ComponentLink8Description=https://datasheet.octopart.com:443/22-28-5023-Molex-datasheet-37168979.pdf?src-supplier=Electro+Sonic, ComponentLink8URL=https://datasheet.octopart.com:443/22-28-5023-Molex-datasheet-37168979.pdf?src-supplier=Electro+Sonic, ComponentLink9Description=https://datasheet.octopart.com:443/22-28-5023-Molex-datasheet-27084077.pdf?src-supplier=Electro+Sonic, ComponentLink9URL=https://datasheet.octopart.com:443/22-28-5023-Molex-datasheet-27084077.pdf?src-supplier=Electro+Sonic, ComponentLink10Description=https://datasheet.octopart.com:443/22-28-5023-Molex-datasheet-25395184.pdf?src-supplier=Electro+Sonic, ComponentLink10URL=https://datasheet.octopart.com:443/22-28-5023-Molex-datasheet-25395184.pdf?src-supplier=Electro+Sonic, ComponentLink11Description=https://datasheet.octopart.com:443/0022285023-Molex-datasheet-11747570.pdf?src-supplier=Arrow+Electronics, ComponentLink11URL=https://datasheet.octopart.com:443/0022285023-Molex-datasheet-11747570.pdf?src-supplier=Arrow+Electronics, ComponentLink12Description=https://datasheet.octopart.com:443/22-28-5023-Molex-datasheet-8219887.pdf?src-supplier=Jameco, ComponentLink12URL=https://datasheet.octopart.com:443/22-28-5023-Molex-datasheet-8219887.pdf?src-supplier=Jameco, ComponentLink13Description=http://sigma.octopart.com:80/16300927/rohs_statement/Molex-22-28-5023.pdf?src-supplier=Compliance+Statements, ComponentLink13URL=http://sigma.octopart.com:80/16300927/rohs_statement/Molex-22-28-5023.pdf?src-supplier=Compliance+Statements, ComponentLink14Description=http://sigma.octopart.com:80/reach_statement/Molex-company-74.pdf?src-supplier=Compliance+Statements, ComponentLink14URL=http://sigma.octopart.com:80/reach_statement/Molex-company-74.pdf?src-supplier=Compliance+Statements, ComponentLink15Description=http://sigma.octopart.com:80/rohs_statement/Molex-company-73.pdf?src-supplier=Compliance+Statements, ComponentLink15URL=http://sigma.octopart.com:80/rohs_statement/Molex-company-73.pdf?src-supplier=Compliance+Statements, ComponentLink16Description=http://sigma.octopart.com:80/conflict_mineral_statement/Molex-company-72.pdf?src-supplier=Compliance+Statements, ComponentLink16URL=http://sigma.octopart.com:80/conflict_mineral_statement/Molex-company-72.pdf?src-supplier=Compliance+Statements, Connector Type="Header, Unshrouded", Contact Finish=Gold, Contact Finish Thickness=Flash, Contact Gender=Male, Contact Material=Brass, Contact Mating Length="0.217\" (5.50mm)", Contact Plating=Gold, Contact Type="Male Pin", Country of Origin=US, Export Control Classification Number (ECCN) Code=EAR99, Fastening Type=-, Features=-, Gender=Male, Glow Wire Compliant=Non-compliant, Harmonized Tariff Schedule (HTS) Code=8536.69.40.40, Housing Material=Thermoplastic, Introduction Date=1994-12-01, Lifecycle Status=Production, Mounting Technology="Through Hole", Mounting Type="Through Hole", Number of Circuits=2, Number of Contacts=2, Number of Positions=2, Number of Positions Loaded=All, Number of Rows=1, Orientation=Vertical, Packaging=Bulk, Pitch="0.100\" (2.54mm)", Plating=Tin, Plating Thickness=381nm, Pricing="1=0.213, 10=0.173, 25=0.163, 50=0.153, 100=0.144, 250=0.134, 500=0.125, 1000=0.108 (USD)", REACH SVHC=Yes, RoHS="RoHS Compliant", Row Spacing=-, Stock=18255, Supplier=Newark, Supplier 1=Digi-Key, Supplier Part Number=22-28-5023, Terminal Pitch=2.54mm, Termination=Solder
J2: library part USB_Micro_TypeB, "USB - micro B USB 2.0 Receptacle Connector 5 Position Surface Mount, Right Angle, Horizontal", Color=Black, Contact Resistance=30mΩ, Current Rating=1.8A, Dielectric Material="Liquid Crystal Polymer", Flammability Rating="UL94 V-0", Insulation Resistance=1GΩ, Manufacturer="Amphenol Communications Solutions", Manufacturer Part Number=10118193-0001LF, Max Operating Temperature=80°C, Max Voltage Rating (AC)=100V, Min Operating Temperature=-55°C, Operating Force=35.1392N, Supplier Part Number 1=609-4616-2-ND, Category="Connectors, Interconnects", China RoHS=Compliant, ComponentLink1Description=https://datasheet.octopart.com:443/10118193-0001LF-Amphenol-Communications-Solutions-datasheet-182239125.pdf?src-supplier=IHS, ComponentLink1URL=https://datasheet.octopart.com:443/10118193-0001LF-Amphenol-Communications-Solutions-datasheet-182239125.pdf?src-supplier=IHS, ComponentLink2Description=https://datasheet.octopart.com:443/10118193-0001LF-Amphenol-Communications-Solutions-datasheet-55953155.pdf?src-supplier=TME, ComponentLink2URL=https://datasheet.octopart.com:443/10118193-0001LF-Amphenol-Communications-Solutions-datasheet-55953155.pdf?src-supplier=TME, ComponentLink3Description=https://datasheet.octopart.com:443/10118193-0001LF-Amphenol-ICC-datasheet-116246833.pdf?src-supplier=Upverter, ComponentLink3URL=https://datasheet.octopart.com:443/10118193-0001LF-Amphenol-ICC-datasheet-116246833.pdf?src-supplier=Upverter, ComponentLink4Description=https://datasheet.octopart.com:443/10118193-0001LF-FCI-datasheet-141913714.pdf?src-supplier=Upverter, ComponentLink4URL=https://datasheet.octopart.com:443/10118193-0001LF-FCI-datasheet-141913714.pdf?src-supplier=Upverter, ComponentLink5Description=https://datasheet.octopart.com:443/10118193-0001LF-Amphenol-Communications-Solutions-datasheet-96019471.pdf?src-supplier=element14+APAC, ComponentLink5URL=https://datasheet.octopart.com:443/10118193-0001LF-Amphenol-Communications-Solutions-datasheet-96019471.pdf?src-supplier=element14+APAC, ComponentLink6Description=https://datasheet.octopart.com:443/10118193-0001LF-Amphenol-Communications-Solutions-datasheet-11792339.pdf?src-supplier=Electro+Sonic, ComponentLink6URL=https://datasheet.octopart.com:443/10118193-0001LF-Amphenol-Communications-Solutions-datasheet-11792339.pdf?src-supplier=Electro+Sonic, ComponentLink7Description=https://datasheet.octopart.com:443/10118193-0001LF-Amphenol-Communications-Solutions-datasheet-13702206.pdf?src-supplier=RS+(Formerly+Allied+Electronics), ComponentLink7URL=https://datasheet.octopart.com:443/10118193-0001LF-Amphenol-Communications-Solutions-datasheet-13702206.pdf?src-supplier=RS+(Formerly+Allied+Electronics), Connector Type="USB - micro B", Contact Material="Gold, Nickel", Contact Plating=Gold, Depth=5.67mm, Features=Shielded, Gender=Female, Height=3mm, Housing Material=Polymer, Length=7.86mm, Lifecycle Status=Production, Mounting Technology="Horizontal, Surface Mount", Mounting Type="Surface Mount, Right Angle, Horizontal", Number of Contacts=5, Number of Ports=1, Number of Positions=5, Number of Rows=1, Number of Terminals=5, Orientation="Right Angle", Pins=11, Pitch=650µm, Plating Thickness=762nm, Pricing="1=0.3138, 10=0.2371 (USD)", Radiation Hardening=No, REACH SVHC=Yes, RoHS=Compliant, Shell Material="Stainless Steel", Stock=15, Supplier="Arrow Electronics", Supplier 1=Digi-Key, Supplier Part Number=10118193-0001LF, Terminal Pitch=660.4µm, Termination=Solder, USB Standard="USB 2.0", Voltage Rating=100V